# Altium PCB MS_PCB.PcbDoc (part 2 of 3)
Units mil, origin at the board's own origin, x right, y up, seen from the top; angles counter-clockwise.
Board outline 1232.38 x 1705 mil, 2 copper layers (Top Layer, Bottom Layer), stack 33 mil thick; 84 components, 60 nets, 313 pads, 105 vias.
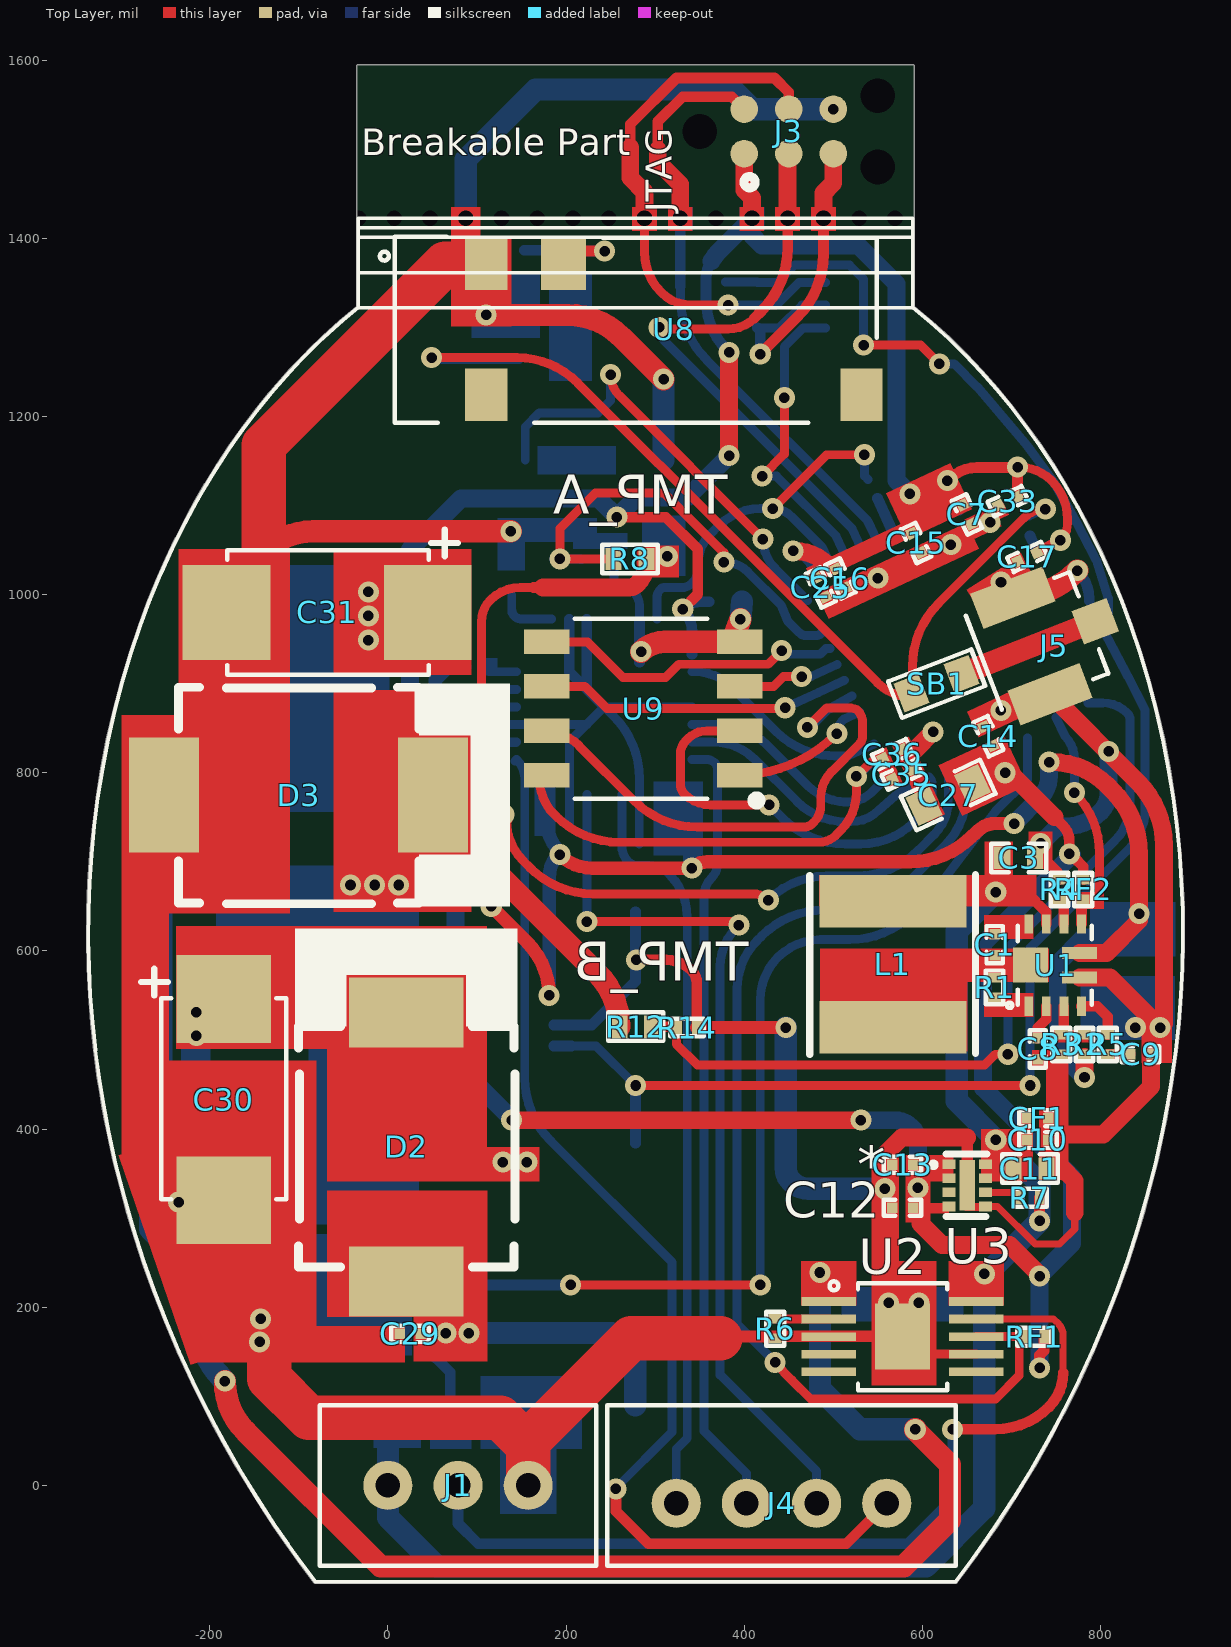
[diagram p0: Top Layer view]

## Part data (continued)
Q1: "TRANS 2NPN PREBIAS 0.15W UMT6", Case/Package=SOT-363, Collector Base Voltage (VCBO)=50V, Continuous Collector Current=100mA, Emitter Base Voltage (VEBO)=5V, MANUFACTURER=Rohm, Max Operating Temperature=150°C, Max Power Dissipation=150mW, Min Operating Temperature=-55°C, Package Quantity=1, Supplier Part Number 1=UMH3NTNCT-ND, Transition Frequency=250MHz, Collector Emitter Breakdown Voltage=50V, Collector Emitter Voltage (VCEO)=50V, ComponentLink1Description=http://www.farnell.com/datasheets/1645293.pdf?src-supplier=Element14, ComponentLink1URL=http://www.farnell.com/datasheets/1645293.pdf?src-supplier=Element14, ComponentLink2Description=http://rohmfs.rohm.com/en/products/databook/datasheet/discrete/transistor/digital/emh3t2r-e.pdf?src-supplier=Digi-Key, ComponentLink2URL=http://rohmfs.rohm.com/en/products/databook/datasheet/discrete/transistor/digital/emh3t2r-e.pdf?src-supplier=Digi-Key, ComponentLink3Description=http://rohmfs.rohm.com/en/techdata_basic/transistor/taping/UMT6_TN_taping.pdf?src-supplier=Digi-Key, ComponentLink3URL=http://rohmfs.rohm.com/en/techdata_basic/transistor/taping/UMT6_TN_taping.pdf?src-supplier=Digi-Key, ComponentLink4Description=http://www.produktinfo.conrad.com/datenblaetter/125000-149999/140593-da-01-en-TRANSISTOR_UMH3_NTN_SOT_363.pdf?src-supplier=Conrad, ComponentLink4URL=http://www.produktinfo.conrad.com/datenblaetter/125000-149999/140593-da-01-en-TRANSISTOR_UMH3_NTN_SOT_363.pdf?src-supplier=Conrad, Current Rating=100mA, Element Configuration=Dual, hFE Min=100, Lead Free="Lead Free", Manufacturer Part Number=UMH3NTN, Max Breakdown Voltage=50V, Max Collector Current=100mA, Max Output Current=100mA, Mount="Surface Mount", Number of Pins=6, Operating Supply Voltage=50V, Packaging="Tape and Reel", Polarity=NPN, Power Dissipation=150mW, Pricing 1="1=0.39, 10=0.293, 25=0.264, 100=0.1392, 500=0.12336, 1000=0.096 (USD)", Radiation Hardening=No, REACH SVHC="No SVHC", Stock 1=12797, Supplier 1=Digi-Key, Voltage Rating (DC)=50V
R1 R4: library part RMCF0201FT150K, "RES 150K OHM 1% 1/20W 0201", Case/Package=0201, Case Code (Metric)=0603, MANUFACTURER="Stackpole Electronics", Max Operating Temperature=125°C, Max Power Dissipation=50mW, Min Operating Temperature=-55°C, Package Quantity=10000, Resistance=150kR, Resistor Type="Thick Film", Supplier Part Number 1=RMCF0201FT150KCT-ND, Temperature Coefficient=200ppm/°C, Tolerance=1%, Case Code (Imperial)=0201, Category="Chip SMD Resistors", ComponentLink1Description=https://www.seielect.com/catalog/SEI-RMCF_RMCP.pdf?src-supplier=Avnet+Asia, ComponentLink1URL=https://www.seielect.com/catalog/SEI-RMCF_RMCP.pdf?src-supplier=Avnet+Asia, ComponentLink2Description=https://www.seielect.com/catalog/SEI-RMCF_RMCP.pdf?src-supplier=Avnet, ComponentLink2URL=https://www.seielect.com/catalog/SEI-RMCF_RMCP.pdf?src-supplier=Avnet, ComponentLink3Description=http://www.seielect.com/Catalog/SEI-RMCF_RMCP.pdf?src-supplier=Digi-Key, ComponentLink3URL=http://www.seielect.com/Catalog/SEI-RMCF_RMCP.pdf?src-supplier=Digi-Key, ComponentLink4Description=https://www.seielect.com/Catalog/SEI-RMCF_RMCP.pdf?src-supplier=Digi-Key, ComponentLink4URL=https://www.seielect.com/Catalog/SEI-RMCF_RMCP.pdf?src-supplier=Digi-Key, ComponentLink5Description=https://www.seielect.com/catalog/SEI-Packaging.pdf?src-supplier=Digi-Key, ComponentLink5URL=https://www.seielect.com/catalog/SEI-Packaging.pdf?src-supplier=Digi-Key, Contact Plating=Tin,Matte, Height=0.009inch, Length=0.024inch, Manufacturer Part Number=RMCF0201FT150K, Mount="Surface Mount", Number of Terminations=2, Packaging="Tape and Reel", Power Rating=50mW, Pricing 1="1=0.10000, 10=0.02300, 100=0.00940, 1000=0.00424, 2500=0.00368, 5000=0.00304 (USD)", Radiation Hardening=No, RoHS=Yes, Stock 1=71595, Supplier 1=Digi-Key, Width=0.012inch
R2: library part RC0201FR-07178KL, "RES SMD 178K OHM 1% 1/20W 0201", Case/Package=0201, Case Code (Metric)=0603, MANUFACTURER=Yageo, Max Operating Temperature=125°C, Max Power Dissipation=50mW, Min Operating Temperature=-55°C, Resistance=178kR, Resistor Type="Thick Film", Supplier Part Number 1=YAG2443CT-ND, Temperature Coefficient=200ppm/°C, Tolerance=1%, Case Code (Imperial)=0201, Category="Chip SMD Resistors", ComponentLink1Description=http://www.yageo.com/documents/recent/PYu-RC_Group_51_RoHS_L_9.pdf?src-supplier=Digi-Key, ComponentLink1URL=http://www.yageo.com/documents/recent/PYu-RC_Group_51_RoHS_L_9.pdf?src-supplier=Digi-Key, ComponentLink2Description=http://www.yageo.com.tw/exep/pages/download/literatures/PYu-R_INT-thick_7.pdf?src-supplier=Digi-Key, ComponentLink2URL=http://www.yageo.com.tw/exep/pages/download/literatures/PYu-R_INT-thick_7.pdf?src-supplier=Digi-Key, Features="Moisture Resistant", Height=0.01inch, Length=0.024inch, Manufacturer Part Number=RC0201FR-07178KL, Number of Terminations=2, Packaging="Tape and Reel", Pricing 1="1=0.10000, 10=0.03600, 100=0.01480, 1000=0.00665, 2500=0.00577, 5000=0.00477 (USD)", RoHS=Yes, Stock 1=50010, Supplier 1=Digi-Key, Width=0.012inch
R3: library part RC0201JR-0724KL, "RES SMD 24K OHM 5% 1/20W 0201", Case/Package=0201, Case Code (Metric)=0603, MANUFACTURER=Yageo, Max Operating Temperature=125°C, Min Operating Temperature=-55°C, Power Rating=50mW, Resistance=24kR, Supplier Part Number 1=311-24KNCT-ND, Temperature Coefficient=200ppm/°C, Tolerance=5%, Voltage Rating=25V, Case Code (Imperial)=0201, Category="Chip SMD Resistors", ComponentLink1Description=http://www.mouser.com/ds/2/447/PYu-RC_Group_51_RoHS_L_7-1101646.pdf?src-supplier=Mouser, ComponentLink1URL=http://www.mouser.com/ds/2/447/PYu-RC_Group_51_RoHS_L_7-1101646.pdf?src-supplier=Mouser, ComponentLink2Description=http://www.yageo.com/documents/recent/PYu-RC_Group_51_RoHS_L_10.pdf?src-supplier=Digi-Key, ComponentLink2URL=http://www.yageo.com/documents/recent/PYu-RC_Group_51_RoHS_L_10.pdf?src-supplier=Digi-Key, ComponentLink3Description=http://www.yageo.com/documents/recent/PYu-RC_Group_51_RoHS_L_9.pdf?src-supplier=Digi-Key, ComponentLink3URL=http://www.yageo.com/documents/recent/PYu-RC_Group_51_RoHS_L_9.pdf?src-supplier=Digi-Key, Height=0.23mm, Length=0.6mm, Manufacturer Part Number=RC0201JR-0724KL, Packaging="Tape and Reel", Pricing 1="1=0.10000, 10=0.02600, 100=0.01040, 1000=0.00466, 2500=0.00405, 5000=0.00334 (USD)", RoHS=Yes, Stock 1=16082, Supplier 1=Digi-Key, Termination=SMD/SMT, Weight=6E-06oz, Width=0.3mm
R5: library part RC0201FR-0718KL, "RES SMD 18K OHM 1% 1/20W 0201", Case/Package=0201, Case Code (Metric)=0603, MANUFACTURER=Yageo, Max Operating Temperature=125°C, Max Power Dissipation=50mW, Min Operating Temperature=-55°C, Package Quantity=1, Resistance=18kR, Resistor Type="Thick Film", Supplier Part Number 1=311-18.0KMCT-ND, Temperature Coefficient=200ppm/°C, Tolerance=1%, Voltage Rating=25V, Case Code (Imperial)=0201, Category="Chip SMD Resistors", ComponentLink1Description=https://datasheet.ciiva.com/2493/pyu-r-int-thick-7-2493817.pdf?src-supplier=Digi-Key, ComponentLink1URL=https://datasheet.ciiva.com/2493/pyu-r-int-thick-7-2493817.pdf?src-supplier=Digi-Key, ComponentLink2Description=https://datasheet.ciiva.com/2493/pyu-r-int-thick-7-2493818.pdf?src-supplier=Digi-Key, ComponentLink2URL=https://datasheet.ciiva.com/2493/pyu-r-int-thick-7-2493818.pdf?src-supplier=Digi-Key, ComponentLink3Description=https://datasheet.ciiva.com/2493/pyu-r-int-thick-7-2493819.pdf?src-supplier=Digi-Key, ComponentLink3URL=https://datasheet.ciiva.com/2493/pyu-r-int-thick-7-2493819.pdf?src-supplier=Digi-Key, ComponentLink4Description=https://datasheet.ciiva.com/22661/1563626-22661291.pdf?src-supplier=Element14, ComponentLink4URL=https://datasheet.ciiva.com/22661/1563626-22661291.pdf?src-supplier=Element14, Features="Moisture Resistant", Height=0.01inch, Lead Free="Lead Free", Length=0.024inch, Manufacturer Part Number=RC0201FR-0718KL, Number of Terminations=2, Packaging="Tape and Reel", Power Rating=50mW, Pricing 1="1=0.10000, 10=0.03600, 100=0.01480, 1000=0.00665, 2500=0.00577, 5000=0.00477 (USD)", REACH SVHC="No SVHC", RoHS=Yes, Stock 1=12981, Supplier 1=Digi-Key, Termination=SMD/SMT, Width=0.012inch
R6: library part RC0201FR-071K1L, "RES SMD 1.1K OHM 1% 1/20W 0201", Case/Package=0201, Case Code (Metric)=0603, MANUFACTURER=Yageo, Max Operating Temperature=125°C, Max Power Dissipation=50mW, Min Operating Temperature=-55°C, Resistance=1.1kR, Resistor Type="Thick Film", Supplier Part Number 1=YAG2474CT-ND, Temperature Coefficient=200ppm/°C, Tolerance=1%, Case Code (Imperial)=0201, Category="Chip SMD Resistors", ComponentLink1Description=http://www.yageo.com/documents/recent/PYu-RC0201_51_RoHS_L_(8).pdf?src-supplier=Future+Electronics, ComponentLink1URL=http://www.yageo.com/documents/recent/PYu-RC0201_51_RoHS_L_(8).pdf?src-supplier=Future+Electronics, ComponentLink2Description=http://www.yageo.com.tw/exep/pages/download/literatures/PYu-R_INT-thick_7.pdf?src-supplier=Digi-Key, ComponentLink2URL=http://www.yageo.com.tw/exep/pages/download/literatures/PYu-R_INT-thick_7.pdf?src-supplier=Digi-Key, ComponentLink3Description=http://www.yageo.com/documents/recent/PYu-RC_Group_51_RoHS_L_9.pdf?src-supplier=Digi-Key, ComponentLink3URL=http://www.yageo.com/documents/recent/PYu-RC_Group_51_RoHS_L_9.pdf?src-supplier=Digi-Key, Features="Moisture Resistant", Height=0.01inch, Lead Free="Lead Free", Length=0.024inch, Manufacturer Part Number=RC0201FR-071K1L, Number of Terminations=2, Packaging="Tape and Reel", Power Rating=50mW, Pricing 1="1=0.10000, 10=0.03600, 100=0.01480, 1000=0.00665, 2500=0.00577, 5000=0.00477 (USD)", RoHS=Yes, Stock 1=18736, Supplier 1=Digi-Key, Width=0.012inch
R7 R16 RF1 RF2 RF3: library part RC0201JR-0710KL, "RES SMD 10K OHM 5% 1/20W 0201", Case/Package=0201, Case Code (Metric)=0603, MANUFACTURER=Yageo, Max Operating Temperature=125°C, Min Operating Temperature=-55°C, Power Rating=50mW, Resistance=10kR, Resistor Type="Thick Film", Supplier Part Number 1=311-10KNCT-ND, Temperature Coefficient=200ppm/°C, Tolerance=5%, Voltage Rating=25V, Case Code (Imperial)=0201, Category="Chip SMD Resistors", ComponentLink1Description="New link", ComponentLink2Description=https://datasheet.ciiva.com/8891/pyu-rc0201-51-rohs-l-8-8891388.pdf?src-supplier=Avnet, ComponentLink2URL=https://datasheet.ciiva.com/8891/pyu-rc0201-51-rohs-l-8-8891388.pdf?src-supplier=Avnet, ComponentLink3Description=https://datasheet.ciiva.com/7672/1563626-7672253.pdf?src-supplier=Element14, ComponentLink3URL=https://datasheet.ciiva.com/7672/1563626-7672253.pdf?src-supplier=Element14, ComponentLink4Description=https://datasheet.ciiva.com/28405/pyu-rc0201-51-rohs-l-8-28405613.pdf?src-supplier=Avnet+Europe, ComponentLink4URL=https://datasheet.ciiva.com/28405/pyu-rc0201-51-rohs-l-8-28405613.pdf?src-supplier=Avnet+Europe, ComponentLink5Description=https://datasheet.ciiva.com/7672/1563626-7672254.pdf?src-supplier=Element14, ComponentLink5URL=https://datasheet.ciiva.com/7672/1563626-7672254.pdf?src-supplier=Element14, ComponentLink6Description=https://datasheet.ciiva.com/7660/1421516-7660810.pdf?src-supplier=Element14, ComponentLink6URL=https://datasheet.ciiva.com/7660/1421516-7660810.pdf?src-supplier=Element14, ComponentLink7Description=https://datasheet.ciiva.com/16856/pyu-rc0201-51-rohs-l-8-16856011.pdf?src-supplier=Avnet+Europe, ComponentLink7URL=https://datasheet.ciiva.com/16856/pyu-rc0201-51-rohs-l-8-16856011.pdf?src-supplier=Avnet+Europe, ComponentLink8Description=https://datasheet.ciiva.com/46391/1421516-46391291.pdf?src-supplier=Element14, ComponentLink8URL=https://datasheet.ciiva.com/46391/1421516-46391291.pdf?src-supplier=Element14, Contact Plating=Tin,Matte, Depth=0.3mm, Lead Free="Lead Free", Length=0.6mm, Manufacturer Part Number=RC0201JR-0710KL, Military Standard=Not, Packaging="Tape and Reel", Pricing 1="1=0.10000, 10=0.02600, 100=0.01050, 1000=0.00472, 2500=0.00410, 5000=0.00338 (USD)", Radiation Hardening=No, REACH SVHC=Unknown, RoHS=Yes, Stock 1=1488597, Supplier 1=Digi-Key, Termination=SMD/SMT, Voltage Rating (DC)=25V
R8 R12: "THERMISTOR NTC 10KOHM 3380K 0402", Case/Package=0402, Case Code (Metric)=1005, MANUFACTURER="TDK EPCOS", Max Operating Temperature=125°C, Max Power Dissipation=150mW, Min Operating Temperature=-55°C, Package Quantity=10000, Resistance=10kR, Resistance Tolerance=1%, Supplier Part Number 1=495-5814-1-ND, Case Code (Imperial)=0402, Category=Thermistors, ComponentLink1Description=https://datasheet.ciiva.com/29706/ntc-smd-standard-series-0402-29706167.pdf?src-supplier=Digi-Key, ComponentLink1URL=https://datasheet.ciiva.com/29706/ntc-smd-standard-series-0402-29706167.pdf?src-supplier=Digi-Key, ComponentLink2Description=https://datasheet.ciiva.com/29706/ntc-smd-standard-series-0402-29706168.pdf?src-supplier=Digi-Key, ComponentLink2URL=https://datasheet.ciiva.com/29706/ntc-smd-standard-series-0402-29706168.pdf?src-supplier=Digi-Key, ComponentLink3Description=https://datasheet.ciiva.com/46409/1835848-46409416.pdf?src-supplier=Element14, ComponentLink3URL=https://datasheet.ciiva.com/46409/1835848-46409416.pdf?src-supplier=Element14, ComponentLink4Description=https://datasheet.ciiva.com/29706/ntc-smd-standard-series-0402-29706169.pdf?src-supplier=Digi-Key, ComponentLink4URL=https://datasheet.ciiva.com/29706/ntc-smd-standard-series-0402-29706169.pdf?src-supplier=Digi-Key, ComponentLink5Description=https://datasheet.ciiva.com/46409/1835848-46409417.pdf?src-supplier=Element14, ComponentLink5URL=https://datasheet.ciiva.com/46409/1835848-46409417.pdf?src-supplier=Element14, Contact Plating=Tin, Depth=0.5mm, Height=0.9mm, Length=1mm, Manufacturer Part Number=B57230V2103F260, Mount="Surface Mount", Number of Pins=2, Packaging="Tape and Reel", Power Rating=150mW, Pricing 1="1=0.12000, 5=0.11400, 10=0.10200, 25=0.09360, 50=0.07500, 100=0.06430, 500=0.05628, 1000=0.04824, 5000=0.04288 (USD)", REACH SVHC="No SVHC", RoHS=Yes, RoHS Compliant=Yes, Series=-, Stock 1=17040, Supplier 1=Digi-Key, Termination=SMD/SMT, Tolerance=1%, Width=0.8mm
R9 R18: library part RC0201FR-07100KL, "RES SMD 100K OHM 1% 1/20W 0201", Case/Package=0201, Case Code (Metric)=0603, MANUFACTURER=Yageo, Max Operating Temperature=125°C, Max Power Dissipation=50mW, Min Operating Temperature=-55°C, Package Quantity=10000, Resistance=100kR, Resistance Tolerance=1%, Resistor Type="Thick Film", Supplier Part Number 1=311-100KMCT-ND, Temperature Coefficient=200ppm/°C, Voltage Rating=25V, Case Code (Imperial)=0201, ComponentLink1Description=http://www.yageo.com/documents/recent/PYu-RC_Group_51_RoHS_L_9.pdf?src-supplier=Digi-Key, ComponentLink1URL=http://www.yageo.com/documents/recent/PYu-RC_Group_51_RoHS_L_9.pdf?src-supplier=Digi-Key, ComponentLink2Description=http://www.yageo.com.tw/exep/pages/download/literatures/PYu-R_INT-thick_7.pdf?src-supplier=Digi-Key, ComponentLink2URL=http://www.yageo.com.tw/exep/pages/download/literatures/PYu-R_INT-thick_7.pdf?src-supplier=Digi-Key, ComponentLink3Description=http://www.farnell.com/datasheets/2167052.pdf?src-supplier=Element14, ComponentLink3URL=http://www.farnell.com/datasheets/2167052.pdf?src-supplier=Element14, ComponentLink4Description=http://www.yageo.com/documents/recent/PYu-RC_Group_51_RoHS_L_10.pdf?src-supplier=Digi-Key, ComponentLink4URL=http://www.yageo.com/documents/recent/PYu-RC_Group_51_RoHS_L_10.pdf?src-supplier=Digi-Key, ComponentLink5Description=https://www.verical.com/server-webapp/html/getDatasheet?partID=420441&src-supplier=Verical, ComponentLink5URL=https://www.verical.com/server-webapp/html/getDatasheet?partID=420441&src-supplier=Verical, ComponentLink6Description=http://www.farnell.com/datasheets/1421516.pdf?src-supplier=Element14, ComponentLink6URL=http://www.farnell.com/datasheets/1421516.pdf?src-supplier=Element14, ComponentLink7Description=http://www.yageo.com/documents/recent/PYu-RC0201_51_RoHS_L_8.pdf?src-supplier=Avnet+Europe, ComponentLink7URL=http://www.yageo.com/documents/recent/PYu-RC0201_51_RoHS_L_8.pdf?src-supplier=Avnet+Europe, Construction=Rectangular, Contact Plating=Tin,Matte, Depth=0.3mm, Features="Moisture Resistant", Height=0.01inch, Lead Free="Lead Free", Length=0.024inch, Manufacturer Part Number=RC0201FR-07100KL, Military Standard=Not, Number of Pins=2, Number of Terminations=2, Packaging="Tape and Reel", Power Rating=50mW, Pricing 1="1=0.1, 10=0.036, 100=0.0148, 1000=0.0067, 2500=0.0058, 5000=0.0048 (USD)", REACH SVHC="No SVHC", RoHS Compliant=Yes, Series=RC, Size Code=0201, Stock 1=2817321, Supplier 1=Digi-Key, Termination=SMD/SMT, Tolerance=1%, Voltage Rating (DC)=25V, Width=0.012inch
R10: library part AC0201FR-0756KL, "RES SMD 56K OHM 1% 1/20W 0201", Case/Package=0201, MANUFACTURER=Yageo, Max Operating Temperature=155°C, Max Power Dissipation=50mW, Min Operating Temperature=-55°C, Resistance=56kR, Resistor Type="Thick Film", Supplier Part Number 1=YAG5226CT-ND, Temperature Coefficient=200ppm/°C, Tolerance=1%, Category="Chip SMD Resistors", ComponentLink1Description=http://www.yageo.com/NewPortal/yageodocoutput?fileName=/pdf/R-Chip/PYu-AC_51_RoHS_L_5.pdf&src-supplier=Digi-Key, ComponentLink1URL=http://www.yageo.com/NewPortal/yageodocoutput?fileName=/pdf/R-Chip/PYu-AC_51_RoHS_L_5.pdf&src-supplier=Digi-Key, ComponentLink2Description=http://www.yageo.com/NewPortal/yageodocoutput?fileName=/pdf/R-Chip/PYu-AC_51_RoHS_L_6.pdf&src-supplier=Digi-Key, ComponentLink2URL=http://www.yageo.com/NewPortal/yageodocoutput?fileName=/pdf/R-Chip/PYu-AC_51_RoHS_L_6.pdf&src-supplier=Digi-Key, Features="Moisture Resistant,Automotive AEC-Q200", Height=0.01inch, Length=0.024inch, Manufacturer Part Number=AC0201FR-0756KL, Number of Terminations=2, Packaging="Tape and Reel", Pricing 1="1=0.10000, 10=0.05700, 100=0.02320, 1000=0.01044, 2500=0.00906, 5000=0.00749 (USD)", RoHS=Yes, RoHS Compliant=Yes, Stock 1=23567, Supplier 1=Digi-Key, Width=0.012inch
R11 R14 RF5: library part RC0201FR-071KP, "RES 1K OHM 1% 1/20W 0201", MANUFACTURER=Yageo, Supplier Part Number 1=13-RC0201FR-071KPCT-ND, Manufacturer Part Number=RC0201FR-071KP, Pricing 1="1=0.11000, 10=0.10200, 100=0.03940, 1000=0.01734, 2500=0.01497, 5000=0.01340 (USD)", RoHS=Yes, RoHS Compliant=Yes, Stock 1=4800, Supplier 1=Digi-Key
R13: library part RN73H1ETTP1983D25, "RES 198K OHM 0.5% 1/16W 0402", Case/Package=0402, Case Code (Metric)=1005, MANUFACTURER="KOA Speer", Max Operating Temperature=155°C, Min Operating Temperature=-55°C, Package Quantity=10000, Power Rating=63mW, Resistance=198kR, Supplier Part Number 1=2019-RN73H1ETTP1983D25CT-ND, Temperature Coefficient=25ppm/°C, Tolerance=0.5%, Voltage Rating=50V, Case Code (Imperial)=0402, ComponentLink1Description=http://www.yageo.com/documents/recent/PYu-RC_Group_51_RoHS_L_9.pdf?src-supplier=Digi-Key, ComponentLink1URL=http://www.yageo.com/documents/recent/PYu-RC_Group_51_RoHS_L_9.pdf?src-supplier=Digi-Key, ComponentLink2Description=http://www.yageo.com.tw/exep/pages/download/literatures/PYu-R_INT-thick_7.pdf?src-supplier=Digi-Key, ComponentLink2URL=http://www.yageo.com.tw/exep/pages/download/literatures/PYu-R_INT-thick_7.pdf?src-supplier=Digi-Key, ComponentLink3Description=http://www.koaspeer.com/products/resistors/surface-mount-resistors/rn73h/?src-supplier=Mouser, ComponentLink3URL=http://www.koaspeer.com/products/resistors/surface-mount-resistors/rn73h/?src-supplier=Mouser, Manufacturer Part Number=RN73H1ETTP1983D25, Packaging="Tape and Reel", Pricing 1="1000=0.0784 (USD)", RoHS Compliant=Yes, Stock 1=0, Supplier 1=Digi-Key
R17: library part RC0201JR-071K2L, "RES SMD 1.2K OHM 5% 1/20W 0201", Case/Package=0201, Case Code (Metric)=0603, MANUFACTURER=Yageo, Max Operating Temperature=125°C, Max Power Dissipation=50mW, Min Operating Temperature=-55°C, Package Quantity=1, Resistance=1.2kR, Resistor Type="Thick Film", Supplier Part Number 1=311-1.2KNCT-ND, Temperature Coefficient=200ppm/°C, Tolerance=5%, Case Code (Imperial)=0201, Category="Chip SMD Resistors", ComponentLink1Description=https://datasheet.ciiva.com/8895/pyu-rc0201-51-rohs-l-8-8895816.pdf?src-supplier=Avnet, ComponentLink1URL=https://datasheet.ciiva.com/8895/pyu-rc0201-51-rohs-l-8-8895816.pdf?src-supplier=Avnet, ComponentLink2Description=https://datasheet.ciiva.com/16855/pyu-rc0201-51-rohs-l-8-16855241.pdf?src-supplier=Avnet+Europe, ComponentLink2URL=https://datasheet.ciiva.com/16855/pyu-rc0201-51-rohs-l-8-16855241.pdf?src-supplier=Avnet+Europe, ComponentLink3Description=https://datasheet.ciiva.com/2462/pyu-r-int-thick-7-2462826.pdf?src-supplier=Digi-Key, ComponentLink3URL=https://datasheet.ciiva.com/2462/pyu-r-int-thick-7-2462826.pdf?src-supplier=Digi-Key, ComponentLink4Description=https://datasheet.ciiva.com/2462/pyu-r-int-thick-7-2462827.pdf?src-supplier=Digi-Key, ComponentLink4URL=https://datasheet.ciiva.com/2462/pyu-r-int-thick-7-2462827.pdf?src-supplier=Digi-Key, ComponentLink5Description=https://datasheet.ciiva.com/28418/pyu-rc0201-51-rohs-l-8-28418507.pdf?src-supplier=Avnet+Europe, ComponentLink5URL=https://datasheet.ciiva.com/28418/pyu-rc0201-51-rohs-l-8-28418507.pdf?src-supplier=Avnet+Europe, ComponentLink6Description=https://datasheet.ciiva.com/2462/pyu-r-int-thick-7-2462828.pdf?src-supplier=Digi-Key, ComponentLink6URL=https://datasheet.ciiva.com/2462/pyu-r-int-thick-7-2462828.pdf?src-supplier=Digi-Key, Contact Plating=Tin,Matte, Features="Moisture Resistant", Height=0.01inch, Length=0.024inch, Manufacturer Part Number=RC0201JR-071K2L, Number of Terminations=2, Packaging="Tape and Reel", Pricing 1="1=0.10000, 10=0.02600, 100=0.01040, 1000=0.00466, 2500=0.00405, 5000=0.00334 (USD)", Radiation Hardening=No, RoHS=Yes, Stock 1=285, Supplier 1=Digi-Key, Width=0.012inch
R19: library part RN73H1JTTD3203C25, "RES 320K OHM 0.25% 1/10W 0603"
R27: library part RMCF0201JT6K20, "RES 6.2K OHM 5% 1/20W 0201", Case/Package=0201, Case Code (Metric)=0603, MANUFACTURER="Stackpole Electronics", Max Operating Temperature=125°C, Max Power Dissipation=50mW, Min Operating Temperature=-55°C, Resistance=6.2kR, Resistor Type="Thick Film", Supplier Part Number 1=RMCF0201JT6K20CT-ND, Temperature Coefficient=200ppm/°C, Tolerance=5%, Case Code (Imperial)=0201, Category="Chip SMD Resistors", ComponentLink1Description=https://www.seielect.com/catalog/SEI-RMCF_RMCP.pdf?src-supplier=Avnet, ComponentLink1URL=https://www.seielect.com/catalog/SEI-RMCF_RMCP.pdf?src-supplier=Avnet, ComponentLink2Description=https://www.seielect.com/Catalog/SEI-RMCF_RMCP.pdf?src-supplier=Digi-Key, ComponentLink2URL=https://www.seielect.com/Catalog/SEI-RMCF_RMCP.pdf?src-supplier=Digi-Key, ComponentLink3Description=https://www.seielect.com/catalog/SEI-Packaging.pdf?src-supplier=Digi-Key, ComponentLink3URL=https://www.seielect.com/catalog/SEI-Packaging.pdf?src-supplier=Digi-Key, Contact Plating=Tin,Matte, Height=0.009inch, Length=0.024inch, Manufacturer Part Number=RMCF0201JT6K20, Mount="Surface Mount", Number of Terminations=2, Packaging="Tape and Reel", Pricing 1="1=0.10000, 10=0.01700, 100=0.00710, 1000=0.00318, 2500=0.00276, 5000=0.00228 (USD)", Radiation Hardening=No, RoHS=Yes, RoHS Compliant=Yes, Series=RMCF, Stock 1=8800, Supplier 1=Digi-Key, Width=0.012inch
R28: library part RMCF0201JT2K00, "RES 2K OHM 5% 1/20W 0201", Case/Package=0201, Case Code (Metric)=0603, MANUFACTURER="Stackpole Electronics", Max Operating Temperature=125°C, Max Power Dissipation=50mW, Min Operating Temperature=-55°C, Resistance=2kR, Resistor Type="Thick Film", Supplier Part Number 1=RMCF0201JT2K00CT-ND, Temperature Coefficient=200ppm/°C, Tolerance=5%, Case Code (Imperial)=0201, Category="Chip SMD Resistors", ComponentLink1Description=https://www.seielect.com/catalog/SEI-RMCF_RMCP.pdf?src-supplier=Avnet, ComponentLink1URL=https://www.seielect.com/catalog/SEI-RMCF_RMCP.pdf?src-supplier=Avnet, ComponentLink2Description=https://www.seielect.com/Catalog/SEI-RMCF_RMCP.pdf?src-supplier=Digi-Key, ComponentLink2URL=https://www.seielect.com/Catalog/SEI-RMCF_RMCP.pdf?src-supplier=Digi-Key, ComponentLink3Description=https://www.seielect.com/catalog/SEI-RMCF_RMCP.pdf?src-supplier=Avnet+Asia, ComponentLink3URL=https://www.seielect.com/catalog/SEI-RMCF_RMCP.pdf?src-supplier=Avnet+Asia, Contact Plating=Tin,Matte, Height=0.009inch, Length=0.024inch, Manufacturer Part Number=RMCF0201JT2K00, Mount="Surface Mount", Number of Terminations=2, Packaging="Tape and Reel", Power Rating=50mW, Pricing 1="1=0.10000, 10=0.01700, 100=0.00710, 1000=0.00318, 2500=0.00276, 5000=0.00228 (USD)", Radiation Hardening=No, RoHS=Yes, RoHS Compliant=Yes, Series=RMCF, Stock 1=15230, Supplier 1=Digi-Key, Width=0.012inch
SB1 SB2: "Solder Bridge ON"
SW2: "SWITCH TACTILE SPST-NO 0.05A 12V", Contact Current Rating=50mA, Insulation Resistance=100MR, MANUFACTURER="Wurth Electronics", Max Operating Temperature=85°C, Min Operating Temperature=-40°C, Operating Force=160gf, Supplier Part Number 1=732-7045-1-ND, Actuator Length=0.8mm, Actuator Material="Polymer,Liquid Crystal Polymer", Actuator Type=Standard, Category="Tactile Switches", ComponentLink1Description=https://datasheet.ciiva.com/30466/0900766b8126b630-30466740.pdf?src-supplier=RSComponents, ComponentLink1URL=https://datasheet.ciiva.com/30466/0900766b8126b630-30466740.pdf?src-supplier=RSComponents, ComponentLink2Description=https://datasheet.ciiva.com/29123/711753-da-01-en-taster-434121025816-29123820.pdf?src-supplier=Conrad, ComponentLink2URL=https://datasheet.ciiva.com/29123/711753-da-01-en-taster-434121025816-29123820.pdf?src-supplier=Conrad, ComponentLink3Description=https://datasheet.ciiva.com/1532/434121025816-1532523.pdf?src-supplier=Element14, ComponentLink3URL=https://datasheet.ciiva.com/1532/434121025816-1532523.pdf?src-supplier=Element14, ComponentLink4Description=https://datasheet.ciiva.com/1633/434121025816-1633932.pdf?src-supplier=Farnell, ComponentLink4URL=https://datasheet.ciiva.com/1633/434121025816-1633932.pdf?src-supplier=Farnell, Contact Material="Stainless Steel,Steel", Current Rating=50mA, Height=2.5mm, Illumination Type=Non-Illuminated,Illuminated, Lead Free="Lead Free", Length=7.3mm, Manufacturer Part Number=434121025816, Mechanical Life=50000Cycles, Mount="Surface Mount", Packaging="Tape and Reel", Pricing 1="1=0.55000, 50=0.50700, 100=0.46100, 500=0.41900, 1000=0.36400 (USD)", REACH SVHC="No SVHC", RoHS=Yes, Stock 1=2355, Supplier 1=Digi-Key, Switch Function=Off-Mom, Switch Travel=0.25mm, Termination=SMD/SMT, Throw Configuration=SPST, Width=3.9mm
U1: "IC REG BOOST ADJ 7A 11VQFN", MANUFACTURER="Texas Instruments", Max Operating Temperature=85°C, Min Operating Temperature=-40°C, Quiescent Current=10uA, Supplier Part Number 1=296-46242-1-ND, Category="Voltage Regulators - Switching", ComponentLink1Description=http://www.ti.com/lit/ds/symlink/tps61089.pdf?src-supplier=Digi-Key, ComponentLink1URL=http://www.ti.com/lit/ds/symlink/tps61089.pdf?src-supplier=Digi-Key, ComponentLink2Description=http://www.ti.com/general/docs/suppproductinfo.tsp?distId=10&amp;gotoUrl=http%3A%2F%2Fwww.ti.com%2Flit%2Fgpn%2Ftps61089&src-supplier=Digi-Key, ComponentLink2URL=http://www.ti.com/general/docs/suppproductinfo.tsp?distId=10&amp;gotoUrl=http%3A%2F%2Fwww.ti.com%2Flit%2Fgpn%2Ftps61089&src-supplier=Digi-Key, Lead Free="Lead Free", Manufacturer Part Number=TPS61089RNRT, Pricing 1="1=2.95000, 10=2.64900, 25=2.50440, 100=2.05910 (USD)", RoHS=No, Supplier 1=Digi-Key, Topology=Boost
U2: "IC BATT CHG LI-ION 1CELL 10MSOP", Battery Pack Voltage=4.2V, Case/Package="HTSSOP EP", MANUFACTURER="Texas Instruments", Max Charge Current=1A, Max Operating Temperature=125°C, Max Supply Voltage=6.45V, Min Input Voltage=4.5V, Min Operating Temperature=-40°C, Min Supply Voltage=3.5V, Package Quantity=2500, Supplier Part Number 1=296-41204-1-ND, Category="Battery Management", ComponentLink1Description=https://datasheet.ciiva.com/15114/getdatasheetpartid-516671-15114858.pdf?src-supplier=Verical, ComponentLink1URL=https://datasheet.ciiva.com/15114/getdatasheetpartid-516671-15114858.pdf?src-supplier=Verical, ComponentLink2Description=https://datasheet.ciiva.com/1934/bq24092-1934314.pdf?src-supplier=Digi-Key, ComponentLink2URL=https://datasheet.ciiva.com/1934/bq24092-1934314.pdf?src-supplier=Digi-Key, ComponentLink3Description=https://datasheet.ciiva.com/3214/bq24092-3214092.pdf?src-supplier=Avnet, ComponentLink3URL=https://datasheet.ciiva.com/3214/bq24092-3214092.pdf?src-supplier=Avnet, Contact Plating=Gold, Fault Protection="Over Voltage,Over Temperature,Short Circuit", Interface=USB, Lead Free="Lead Free", Manufacturer Part Number=BQ24092DGQR, Number of Cells=1, Number of Pins=10, Output Current=1A, Output Voltage=4.2V, Packaging="Tape and Reel", Pricing 1="1=1.29000, 10=1.15100, 25=1.09200, 100=0.83850, 250=0.74100, 500=0.70200, 1000=0.54600 (USD)", Radiation Hardening=No, RoHS=Yes, Stock 1=52631, Supplier 1=Digi-Key
U3: "IC REG LINEAR 3.3V 1A 8XDFN", Dropout Voltage=95mV, MANUFACTURER="ON Semiconductor", Max Operating Temperature=125°C, Min Current Limit=1.1A, Min Operating Temperature=-40°C, Output Current=1A, Output Voltage=3.3V, Supplier Part Number 1=NCP186AMX330TAGOSCT-ND, ComponentLink1Description=http://www.farnell.com/datasheets/2236905.pdf?src-supplier=Farnell, ComponentLink1URL=http://www.farnell.com/datasheets/2236905.pdf?src-supplier=Farnell, ComponentLink2Description=http://www.farnell.com/datasheets/2236905.pdf?src-supplier=Newark, ComponentLink2URL=http://www.farnell.com/datasheets/2236905.pdf?src-supplier=Newark, ComponentLink3Description=http://www.onsemi.com/pub/Collateral/NCP186-D.PDF?src-supplier=Digi-Key, ComponentLink3URL=http://www.onsemi.com/pub/Collateral/NCP186-D.PDF?src-supplier=Digi-Key, ComponentLink4Description=https://www.onsemi.com/pub/Collateral/NCP186-D.PDF?src-supplier=Digi-Key, ComponentLink4URL=https://www.onsemi.com/pub/Collateral/NCP186-D.PDF?src-supplier=Digi-Key, Lead Free="Lead Free", Manufacturer Part Number=NCP186AMX330TAG, Mount="Surface Mount", Number of Pins=8, Number of Regulators=1, Packaging="Tape and Reel", Pricing 1="1=0.48, 10=0.39, 25=0.3564, 100=0.2405, 250=0.199, 500=0.18242, 1000=0.13682 (USD)", Stock 1=5995, Supplier 1=Digi-Key
U4: "RX TXRX MOD WIFI SURFACE MOUNT", Case/Package=SMD/SMT, Frequency=2.5GHz, MANUFACTURER="Espressif Systems", Max Operating Temperature=85°C, Min Operating Temperature=-40°C, Supplier Part Number 1=1904-1029-1-ND, ComponentLink1Description=https://www.espressif.com/sites/default/files/documentation/esp32-pico-d4_datasheet_en.pdf?src-supplier=Digi-Key, ComponentLink1URL=https://www.espressif.com/sites/default/files/documentation/esp32-pico-d4_datasheet_en.pdf?src-supplier=Digi-Key, Data Rate=150Mbps, Interface=I2C,SPI,GPIO,PWM,SDIO,UART, Manufacturer Part Number=ESP32-PICO-D4, Memory Size=4MB, Mount="Surface Mount", Pricing 1="1=4.5 (USD)", Sensitivity=-98.4dBm, Stock 1=5967, Supplier 1=Digi-Key
U5: library part TMC2209-LA-T, "Motor Driver, Stepper, QFN-28", MANUFACTURER=Trinamic, Supplier Part Number 1=1460-1398-1-ND, Manufacturer Part Number=TMC2209-LA-T, Pricing 1="1=2.74000, 50=2.46000, 100=2.17000, 500=1.88000, 1000=1.59001 (USD)", RoHS=No, Stock 1=1949, Supplier 1=Digi-Key
U7: "Wireless charging receiver IC Receive universal IC", Package="SOP 8", Manufacturer Part No="XKT-510 T3168"
U8: "RF ANT 2.4GHZ STAMPED MET SLD", MANUFACTURER=Proant, Supplier Part Number 1=1532-1001-6-ND, ComponentLink1Description=https://media.digikey.com/pdf/Data%20Sheets/Proant%20PDF's/PRO-OB-440_Dwg.PDF?src-supplier=Digi-Key, ComponentLink1URL=https://media.digikey.com/pdf/Data%20Sheets/Proant%20PDF's/PRO-OB-440_Dwg.PDF?src-supplier=Digi-Key, ComponentLink2Description=http://www.proant.se/files/user/Application%20note%20-%20OnBoard%20SMD%20GNSS%20rev%202.0.pdf?src-supplier=Digi-Key, ComponentLink2URL=http://www.proant.se/files/user/Application%20note%20-%20OnBoard%20SMD%20GNSS%20rev%202.0.pdf?src-supplier=Digi-Key, ComponentLink3Description=http://www.proant.se/files/user/Documents/Datasheet%20-%20OnBoard%20SMD%202400%20MHz%20rev%203.pdf?src-supplier=Digi-Key, ComponentLink3URL=http://www.proant.se/files/user/Documents/Datasheet%20-%20OnBoard%20SMD%202400%20MHz%20rev%203.pdf?src-supplier=Digi-Key, Manufacturer Part Number=PRO-OB-440, Mount="Surface Mount", Number of Bands=1, Packaging="Cut Tape", Pricing 1="1=0.74, 10=0.647, 25=0.608, 100=0.4964, 250=0.46104, 500=0.39238 (USD)", Return Loss=-10dB, Stock 1=23502, Supplier 1=Digi-Key, Termination=Solder
U9: "Volatile 64Mb (8M x 8) SPI/ QPI 2.7V ~ 3.6V SOP-8_150mil RAM RoHS", MANUFACTURER="Lyontek Inc.", Package=SOP-8, Manufacturer Part No=LY68L6400SLIT

## Free pads (board coordinates)
  round 0 hole 17.72 unplated mask+0: NC(-33.14,1422.5) NC(7.02,1422.5) NC(47.18,1422.5) NC(127.49,1422.5) NC(167.65,1422.5) NC(207.81,1422.5) NC(247.97,1422.5) NC(368.44,1422.5) NC(529.07,1422.5) NC(569.23,1422.5)
  round 0 hole 17.72 mask+0: NC(87.34,1422.5) NC(288.12,1422.5) NC(328.28,1422.5) NC(408.6,1422.5) NC(448.75,1422.5) NC(488.91,1422.5)

## Via types
v1: diameter 23.62, hole 11.81, Top Layer to Bottom Layer, 70 vias
v2: diameter 23.62, hole 11.81, Top Layer to Bottom Layer, tented both sides, 35 vias

## Nets (pads, with @x,y where several pads share a name; then routed paths per layer and width w, separated by ;. In a path a pad name is that pad's centre, name@x,y a point inside that pad or via, vN(x,y) a via of type N, cw(c..) or ccw(c..) an arc to the next point about the centre after c; other vN are vias at no path point)
2.5V: R8.1 R12.1 R18.2 R19.2 | length 780.9
  Top Layer w10: 143,672 141.87,673.13 ; 163.63,1008 148.8,1008 ccw(c148.8,960.2) 115,994 ccw(c139.14,969.86) 105,969.86 105,751.42 ccw(c205,751.42) 116.58,704.72 ccw(c205,751.42) 134.29,680.71 141.79,673.21 ; 141.79,673.21 ccw(c206.74,738) 141.87,673.13 ; 141.79,673.21 141.87,673.13
  Top Layer w12: 163.63,1008 174,1008
  Top Layer w20: 174,1008 270.29,1008 ccw(c270.29,1021.73) 280,1012.02 ccw(c255.28,1036.74) 290.24,1036.74 R8.1@290.24,1040
  Top Layer w25: 116.58,704.72 ccw(c143.84,704.72) 124.56,685.44 234.81,575.19 cw(c174.62,515) R12.1@259.74,515
  other v1: 313.74,1043
3V3: C7.1 C12.1 C13.1 C14.1 C15.1 C16.1 C17.1 C23.2 C25.1 C27.1 C33.1 J3.1 pad.NC@408.6,1422.5 R16.2 R18.1 RF1.1 RF2.1 U3.1 U3.2 U3.4 U4.1 U4.3 U4.4 U4.19 U4.37 U4.43 U4.46 U5.15 | length 4556.1
  Top Layer w8: C12.1@591.06,313.25 C12.1@589.55,311.75 C13.1@589.55,359.75 628.99,359.75 U3.1@629.74,359
  Top Layer w10: v1(707,1143) 708.79,1143 cw(c708.79,1091.79) 744.99,1128.01 cw(c701.52,1084.53) 763,1084.53 763,1080.31 cw(c735.69,1080.31) v1(755,1061)
  Top Layer w12: v1(257.05,1087) 311.97,1087 348,1050.97 348,1000.68 v1(331,983.68) ; v1(586,1113) cw(c622.21,1076.79) 622.21,1128 v1(628,1128) ccw(c652.84,1128) 635.27,1110.44 C7.1@645.01,1100.7 ; v1@631.22,1129.54 v1@631,1130 ; C14.1@678.99,830.3 693.85,800.42 694.06,799.99 cw(c693,761.37) 695,799.95 v1@695,800.65 ; C33.1@706.7,1109.99 706.7,1142.7 661.67,1142.7 ccw(c661.67,1099.33) v1@631,1130 ; v1(707,1143) 662.38,1143 ccw(c662.38,1098.62) v1@631,1130 ; C17.1@728.57,1047.3 v1(755,1061) ; v2(731.57,132) 731.57,146 736.57,151 RF1.1@736.57,167 ; 748.16,750.28 757.62,740.81 cw(c739.81,723) 765,723 v2(765,709) ; v2@770.17,704.83 780.53,694.47 RF2.1@780.53,679.83
  Top Layer w20: v1(139,410) v1(531,410) ; v1(383,1156) v1(383,1272) ; J3.1@400,1495 400,1454 408.6,1445.4 pad.NC@408.6,1422.5 ; v1(455,1049) 456.79,1049 cw(c456.79,997.79) 493,1034 ; 598,294 622,270 622.63,270 622.68,269.95 622.73,270 697.98,270 731.57,236.41 v2(731.57,235) ; v1(693,800) cw(c693,786.88) 702.27,796.16 748.16,750.28
  Bottom Layer w10: v1(455,1049) cw(c455,1035.65) 464.44,1045.09 473.53,1036 U4.37@480.93,1020.02
  Bottom Layer w12: U5.15@341.43,933.05 341.43,958.51 ccw(c305.83,958.51) v1(331,983.68) cw(c351.09,963.59) 351.09,992 C23.2@360.5,992 ; 363.35,1374.67 ccw(c390.72,1355.28) 357.17,1355.28 R16.2@357.17,1351 357.17,1331.18 ccw(c437.69,1331.18) 380.76,1274.24 v1(383,1272) ; v1(586,1113) 577.12,1094.06 U4.43@586.97,1072.94 ; v1(628,1128) U4.46@641.49,1094.9 ; U4.19@678.78,828.62 v1(693,800) ; v1(707,1143) 707.12,1142.88 U4.1@707.12,1107.73 ; U4.3@720.76,1066.05 U4.4@729.08,1048.21 v1(755,1061) ; v2(765,709) 765.59,709 cw(c765.59,705.59) v2@768,708
  Bottom Layer w20: v1(139,410) 139,411.39 76,474.39 76,709 24.76,760.24 24.76,1050.76 82,1108 236.05,1108 v1(257.05,1087) 279.17,1109.12 336.12,1109.12 v1(383,1156) ; 363.13,1374.28 cw(c405.64,1351) 363.35,1374.67 cw(c405.64,1351) 371.37,1385.27 pad.NC@408.6,1422.5 408.6,1403.1 419.69,1392 528,1392 571,1349 571,1128 v1(586,1113) ; v1(531,410) 568.69,410 cw(c568.69,382.69) 588,402 cw(c571.1,385.1) 595,385.1 v1(595,334) ; v2(731.57,132) v2(731.57,235) 768,271.43 768,346.4 668.19,446.21 668.19,608.19 v2@768,708
8V: C4.2 C5.2 C19.1 C20.1 C21.1 C22.1 R2.1 U1.6 U5.22 U5.28 | length 1820
  Top Layer w15: v1(116,650) 156.25,609.75 ; 156.28,609.72 cw(c96.5,550) v1(181,550) ; v1(193,708) ccw(c229.21,744.21) 229.21,693 v2(341.28,693) cw(c358.18,676.1) 358.18,700 586.46,700 ccw(c586.46,797.46) 655.38,728.54 ccw(c598.22,797.78) 661.7,734.3 cw(c682.72,713.28) 682.72,743 v1(703,743)
  Top Layer w20: v1(742.2,812) 744.76,812 cw(c744.76,723.76) 807.13,786.18 ; U1.6@776.56,597.78 806.59,597.78 843.33,634.52 v2(843.33,642) 843.33,708.55 ccw(c743.33,708.55) 830.06,758.33 ccw(c743.33,708.55) 814.04,779.27 807.15,786.15 ; v2(782,458) R2.1@782,481
  Bottom Layer w15: C19.1@86.19,919 68.12,919 53.02,903.89 53.02,782.42 116,719.44 v1(116,650) ; 178,749 178,747.21 ccw(c229.21,747.21) 193,711 ccw(c221.97,682.03) 181,682.03 181,565
  Bottom Layer w20: 339,722 cw(c333.49,716.49) 341.28,716.49 v2(341.28,693) ; v1(703,743) 732.44,772.44 ccw(c708.87,796) 739.57,783.02 ccw(c708.87,796) 742.2,796 v1(742.2,812) ; v2(782,458) 752,488 752,586 781,615 C5.2@805,615
+5V_TMC: C24.2 U5.8 | length 67.2
  Bottom Layer w10: C24.2@139,999.5 139,983.24 ccw(c149.24,983.24) 142,976 ccw(c150.63,984.63) 150.63,972.43 U5.8@183.94,972.43
\D\R\I\\V\E\_\E\N\_: RF3.2 U4.22 U5.2 | length 763.3
  Top Layer w10: v1@133,746.97 ccw(c198.11,746.97) 152.07,700.93 159.71,693.29 ccw(c230.42,764) 165.42,688.01 ccw(c230.42,764) 230.42,664 410.1,664 cw(c410.1,640.1) v1(427,657) ; v1@133.03,747 v1@135,747
  Bottom Layer w10: v1(130.03,753) cw(c183.21,806.18) 108,806.18 RF3.2@108,834 143.05,834 ccw(c143.05,836.15) U5.2@144.57,834.63 U5.2@132.56,834.63 ; v1(427,657) cw(c492.18,591.82) 492.18,684 525.07,684 ccw(c525.07,784) 595.78,713.29 613.41,730.92 ccw(c575.77,768.56) 629,768.56 629,794.63 ccw(c616.23,794.63) U4.22@625.26,803.66
ADC_BAT: R10.1 R13.2 U4.17 | length 1312
  Top Layer w10: v1(205,225) v1(418,225)
  Bottom Layer w10: v1(418,225) 418,544.72 cw(c486.28,544.72) 438,593 cw(c485.36,545.64) 485.36,612.62 518.19,612.62 ccw(c518.19,712.62) 588.91,641.91 614,667 656.44,722.9 682,756.57 718.06,792.63 718.06,838.64 U4.17@717.78,838.92
  Bottom Layer w12: 70,72 70,127 41,156 41,201 65,225 v1(205,225) ; R13.2@81.24,68 R13.2@82.24,69
BAT: C2.2 C3.2 C10.2 C11.2 CF1.1 J1.1 L1.1 R7.2 R10.2 U1.9 U2.10 U3.7 U3.8 | length 1656.8
  Top Layer w12: 721.6,661 739.16,643.45 U1.9@739.16,630.26 ; v2(731.57,297) R7.2@731.57,323
  Top Layer w25: L1.1@567,649.87 L1.1@567,655.87 L1.1@567,659.02
  Bottom Layer w25: 0,53 J1.1@0,0 0,-36 55,-91 604,-91 669.5,-25.5 C2.2@669.5,205 v2(669.5,237.5) 672.07,237.5 v2(731.57,297) 731.57,338.78 v2(682.34,388) 638.69,431.65 638.69,622.35 v2(682.34,666)
BOOT_: C1.2 U1.10
CHG_: RF1.2 U2.8 U4.21 | length 1248.5
  Top Layer w10: v1(434.74,138) 434.74,137 453.55,118.19 ; 453.55,118.15 474.7,97 682.34,97 708.76,123.41 708.76,160.84 RF1.2@714.91,167 U2.8@660.42,167
  Bottom Layer w10: v1(434.74,138) 392,180.74 392,556.93 cw(c469.88,556.93) 414.81,612 419.52,616.71 cw(c490.23,546) 490.23,646 511.58,646 ccw(c511.58,746) 582.29,675.29 625.67,718.67 ccw(c569.33,775) 649,775 649,797.74 ccw(c628.86,797.74) U4.21@643.1,811.98
CMD: U4.30 U9.7 | length 626.4
  Top Layer w10: U9.7@169.46,847 cw(c169.46,819.15) 178.03,845.65 cw(c178.03,794.18) 214.43,830.57 276.71,768.29 ccw(c347.42,839) 347.42,739 465.93,739 ccw(c465.93,756.07) 478,744 ccw(c458.83,763.17) 485.94,763.17 485.94,772 cw(c527.42,772) 498.09,801.33 529.38,832.62 ccw(c520.64,841.36) 533,841.36 533,855.76 ccw(c512.06,855.76) 526.87,870.57 ccw(c516.04,846.04) 516.04,872.85 492.85,872.85 v1(471,851)
  Bottom Layer w10: v1@471,854.72 v1(471,851) 474.07,851 494.09,871.03 U4.30@521.04,886.04
COMP_: R5.1 U1.4 | length 54.5
  Top Layer w12: U1.4@778.53,537.74 796.26,537.74 808,526 R5.1@808,505.83
CPI_: C18.2 U5.5 | length 35.1
  Bottom Layer w10: C18.2@109.81,894 109.81,893.68 U5.5@144.57,893.68
CPO_: C18.1 U5.4 | length 73.8
  Bottom Layer w10: C18.1@86.19,894 86.19,881.81 94,874 U5.4@144.57,874
DIR_: U4.25 U5.19 | length 262.4
  Bottom Layer w10: U5.19@341.43,854.31 369.25,854.31 cw(c369.25,774.23) 425.88,830.86 470.86,785.88 ccw(c516.44,831.47) 507.64,767.6 ccw(c516.44,831.47) 516.44,767 ccw(c516.44,804.56) 543,778 557.61,792.61 cw(c564.15,786.08) U4.25@564.15,795.32
DTR: J3.5 pad.NC@488.91,1422.5 Q1.2 Q1.4 | length 372.4
  Top Layer w12: v1(418,1270) 459.62,1311.62 ccw(c388.91,1382.33) 488.91,1382.33 pad.NC@488.91,1422.5
  Top Layer w20: pad.NC@488.91,1422.5 488.91,1450.91 500,1462 J3.5@500,1495
  Bottom Layer w10: Q1.4@414.81,1299.41 439.41,1299.41 465,1325 Q1.2@491.19,1325
  Bottom Layer w12: Q1.4@414.81,1299.41 418,1296.22 v1(418,1270)
ENABLE: C34.1 CF2.1 Q1.6 R16.1 SW2.1 U4.9 | length 1932.2
  Top Layer w10: v1(278,448.93) v1(721,448.93) ; v1(534,1280) 598,1280 v1(619,1259)
  Bottom Layer w10: 206,493.19 233.74,493.19 v1(278,448.93) ; R16.1@378.83,1351 413.82,1351 cw(c413.82,1349.6) Q1.6@414.81,1350.59 437.55,1350.59 456.96,1370 518,1370 534,1354 v1(534,1280) ; v1(619,1259) 635.68,1259 661.83,1232.85 717.78,1167 746.59,1127.81 773,1081 794.99,1039.17 808.82,995.43 808.82,981.75 cw(c799.76,981.75) 806.17,975.35 cw(c797.3,984.22) C34.1@797.3,971.67 831,908 850,870.58 850,752.65 cw(c781.07,762) 830.26,712.81 721,603.56 v1(721,448.93) ; U4.9@770.68,959 C34.1@794.99,970.3
  Bottom Layer w12: CF2.1@186,493.19 206,493.19 ; SW2.1@278,384.08 v1@278,445.93